# Altium PCB NewTrackerIRControl.PcbDoc (part 2 of 2)
Units mm, origin at the board's own origin, x right, y up, seen from the top; angles counter-clockwise.
Board outline 54 x 54 mm, 2 copper layers (Top Layer, Bottom Layer), stack 1.581 mm thick; 42 components, 15 nets, 94 pads, 126 vias.
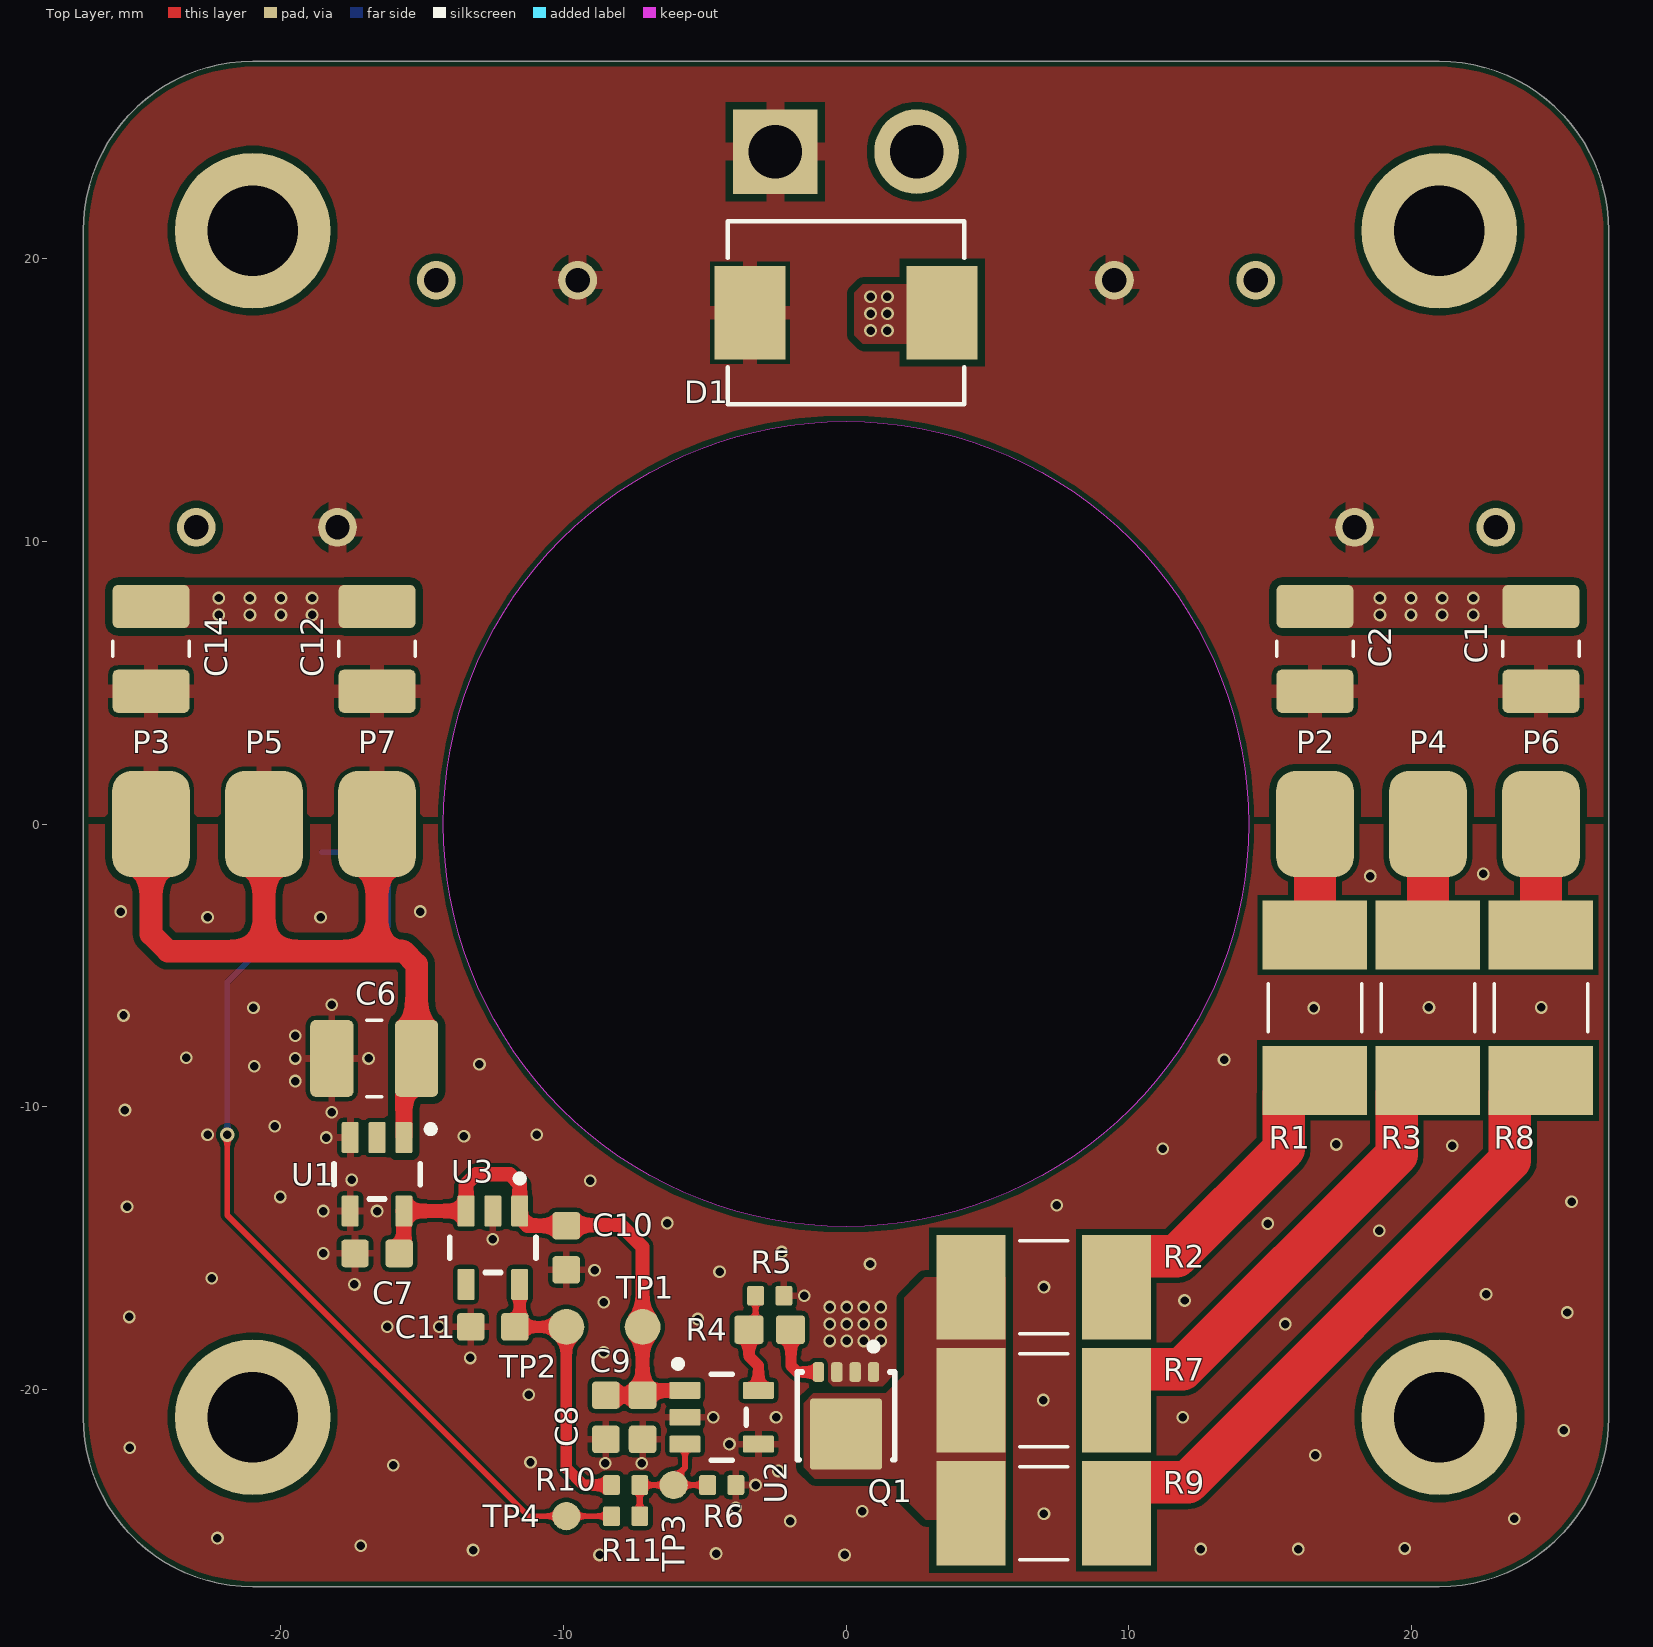
[diagram p0: Top Layer view]

## Part data (continued)
R4: library part CRCW060310R0FKEAHP, "10Ω Res Thick Film 0603 10 Ohm 1% 1/3W ±100ppm/°C Molded SMD SMD Paper T/R", Case Code (Imperial)=0603, Case Code (Metric)=1608, Manufacturer=Vishay, Max Operating Temperature=155°C, Max Power Dissipation=250mW, Min Operating Temperature=-55°C, Power Rating=330mW, Ratings=AEC-Q200, Supplier Part Number 1=541-10.0SCT-ND, Temperature Coefficient=100ppm/°C, Tolerance=±1%, Voltage Rating=75V, Case/Package=0603, Category="Chip SMD Resistors", China RoHS=Non-Compliant, ComponentLink1Description=https://datasheet.octopart.com:443/CRCW060310R0FKEAHP-Vishay-datasheet-13148866.pdf?src-supplier=Future+Electronics, ComponentLink1URL=https://datasheet.octopart.com:443/CRCW060310R0FKEAHP-Vishay-datasheet-13148866.pdf?src-supplier=Future+Electronics, ComponentLink2Description=https://datasheet.octopart.com:443/CRCW060310R0FKEAHP-Vishay-datasheet-13131392.pdf?src-supplier=Future+Electronics, ComponentLink2URL=https://datasheet.octopart.com:443/CRCW060310R0FKEAHP-Vishay-datasheet-13131392.pdf?src-supplier=Future+Electronics, ComponentLink3Description=https://datasheet.octopart.com:443/CRCW060310R0FKEAHP-Vishay-datasheet-12593106.pdf?src-supplier=Future+Electronics, ComponentLink3URL=https://datasheet.octopart.com:443/CRCW060310R0FKEAHP-Vishay-datasheet-12593106.pdf?src-supplier=Future+Electronics, ComponentLink4Description=https://datasheet.octopart.com:443/CRCW060310R0FKEAHP-Vishay-datasheet-12544674.pdf?src-supplier=Future+Electronics, ComponentLink4URL=https://datasheet.octopart.com:443/CRCW060310R0FKEAHP-Vishay-datasheet-12544674.pdf?src-supplier=Future+Electronics, ComponentLink5Description=https://datasheet.octopart.com:443/CRCW060310R0FKEAHP-Vishay-datasheet-12531795.pdf?src-supplier=Future+Electronics, ComponentLink5URL=https://datasheet.octopart.com:443/CRCW060310R0FKEAHP-Vishay-datasheet-12531795.pdf?src-supplier=Future+Electronics, ComponentLink6Description=https://datasheet.octopart.com:443/CRCW060310R0FKEAHP-Vishay-datasheet-12509906.pdf?src-supplier=Future+Electronics, ComponentLink6URL=https://datasheet.octopart.com:443/CRCW060310R0FKEAHP-Vishay-datasheet-12509906.pdf?src-supplier=Future+Electronics, ComponentLink7Description=https://datasheet.octopart.com:443/CRCW060310R0FKEAHP-Vishay-datasheet-10669844.pdf?src-supplier=Future+Electronics, ComponentLink7URL=https://datasheet.octopart.com:443/CRCW060310R0FKEAHP-Vishay-datasheet-10669844.pdf?src-supplier=Future+Electronics, ComponentLink8Description=https://datasheet.octopart.com:443/CRCW060310R0FKEAHP-Vishay-datasheet-8703221.pdf?src-supplier=Future+Electronics, ComponentLink8URL=https://datasheet.octopart.com:443/CRCW060310R0FKEAHP-Vishay-datasheet-8703221.pdf?src-supplier=Future+Electronics, ComponentLink9Description=https://datasheet.octopart.com:443/CRCW060310R0FKEAHP-Vishay-datasheet-62316122.pdf?src-supplier=Future+Electronics, ComponentLink9URL=https://datasheet.octopart.com:443/CRCW060310R0FKEAHP-Vishay-datasheet-62316122.pdf?src-supplier=Future+Electronics, ComponentLink10Description=https://datasheet.octopart.com:443/CRCW060310R0FKEAHP-Vishay-datasheet-12518686.pdf?src-supplier=_legacy+Avnet, ComponentLink10URL=https://datasheet.octopart.com:443/CRCW060310R0FKEAHP-Vishay-datasheet-12518686.pdf?src-supplier=_legacy+Avnet, ComponentLink11Description=https://datasheet.octopart.com:443/CRCW060310R0FKEAHP-Vishay-datasheet-87136057.pdf?src-supplier=element14+APAC, ComponentLink11URL=https://datasheet.octopart.com:443/CRCW060310R0FKEAHP-Vishay-datasheet-87136057.pdf?src-supplier=element14+APAC, ComponentLink12Description=https://datasheet.octopart.com:443/CRCW060310R0FKEAHP-Vishay-datasheet-78776210.pdf?src-supplier=element14+APAC, ComponentLink12URL=https://datasheet.octopart.com:443/CRCW060310R0FKEAHP-Vishay-datasheet-78776210.pdf?src-supplier=element14+APAC, ComponentLink13Description=https://datasheet.octopart.com:443/CRCW060310R0FKEAHP-Vishay-datasheet-62317933.pdf?src-supplier=element14+APAC, ComponentLink13URL=https://datasheet.octopart.com:443/CRCW060310R0FKEAHP-Vishay-datasheet-62317933.pdf?src-supplier=element14+APAC, ComponentLink14Description=https://datasheet.octopart.com:443/CRCW060310R0FKEAHP-Vishay-datasheet-66581887.pdf?src-supplier=element14+APAC, ComponentLink14URL=https://datasheet.octopart.com:443/CRCW060310R0FKEAHP-Vishay-datasheet-66581887.pdf?src-supplier=element14+APAC, ComponentLink15Description=https://datasheet.octopart.com:443/CRCW060310R0FKEAHP-Vishay-datasheet-37143532.pdf?src-supplier=Newark, ComponentLink15URL=https://datasheet.octopart.com:443/CRCW060310R0FKEAHP-Vishay-datasheet-37143532.pdf?src-supplier=Newark, ComponentLink16Description=https://datasheet.octopart.com:443/CRCW060310R0FKEAHP-Vishay-datasheet-8359436.pdf?src-supplier=Newark, ComponentLink16URL=https://datasheet.octopart.com:443/CRCW060310R0FKEAHP-Vishay-datasheet-8359436.pdf?src-supplier=Newark, ComponentLink17Description=https://datasheet.octopart.com:443/CRCW060310R0FKEAHP-Vishay-datasheet-112276998.pdf?src-supplier=Newark, ComponentLink17URL=https://datasheet.octopart.com:443/CRCW060310R0FKEAHP-Vishay-datasheet-112276998.pdf?src-supplier=Newark, ComponentLink18Description=https://datasheet.octopart.com:443/CRCW060310R0FKEAHP-Vishay-datasheet-192322425.pdf?src-supplier=HQonline, ComponentLink18URL=https://datasheet.octopart.com:443/CRCW060310R0FKEAHP-Vishay-datasheet-192322425.pdf?src-supplier=HQonline, ComponentLink19Description=https://datasheet.octopart.com/CRCW060310R0FKEAHP-Vishay-datasheet-83567917.pdf, ComponentLink19URL=https://datasheet.octopart.com/CRCW060310R0FKEAHP-Vishay-datasheet-83567917.pdf, ComponentLink20Description=https://datasheet.octopart.com/D-CRCW-e3-Standard-Thick-Film-Chip-Resistors-Vishay-datasheet-family-64.pdf, ComponentLink20URL=https://datasheet.octopart.com/D-CRCW-e3-Standard-Thick-Film-Chip-Resistors-Vishay-datasheet-family-64.pdf, ComponentLink21Description=https://datasheet.octopart.com:443/CRCW060310R0FKEAHP-Vishay-Dale-datasheet-47688881.pdf?src-supplier=RS+(Formerly+Allied+Electronics), ComponentLink21URL=https://datasheet.octopart.com:443/CRCW060310R0FKEAHP-Vishay-Dale-datasheet-47688881.pdf?src-supplier=RS+(Formerly+Allied+Electronics), ComponentLink22Description=https://datasheet.octopart.com:443/CRCW060310R0FKEAHP-Vishay-datasheet-17834126.pdf?src-supplier=TME, ComponentLink22URL=https://datasheet.octopart.com:443/CRCW060310R0FKEAHP-Vishay-datasheet-17834126.pdf?src-supplier=TME, ComponentLink23Description=http://sigma.octopart.com:80/rohs_certificate/D-CRCW-e3-Standard-Thick-Film-Chip-Resistors-Vishay-family-102.pdf?src-supplier=Compliance+Statements, ComponentLink23URL=http://sigma.octopart.com:80/rohs_certificate/D-CRCW-e3-Standard-Thick-Film-Chip-Resistors-Vishay-family-102.pdf?src-supplier=Compliance+Statements, Composition="Thick Film", Contact Plating=Tin, Depth=850µm, Features="Automotive AEC-Q200", Height=450µm, Lead Free="Lead Free", Length=1.6mm, Lifecycle Status=Production, Manufacturer Part Number=CRCW060310R0FKEAHP, Military Standard=Not, Mount="Surface Mount", Number of Pins=2, Number of Terminals=2, Number of Terminations=2, Packaging="Cut Tape", Pricing 1="1=0.15, 10=0.072, 25=0.0564, 50=0.0472, 100=0.04, 250=0.03284, 500=0.02872, 1000=0.02546 (USD)", Radiation Hardening=No, REACH SVHC=Yes, Resistance=10Ω, RoHS=Compliant, Schedule B="8533210045, 8533210045|8533210045|8533210045|8533210045|8533210045", Stock 1=818624, Supplier 1=DigiKey, Termination=Solder, Voltage Rating (DC)=75V, Weight=2.012816mg, Width=850µm, Working Voltage=75V
R5: library part CRCW040210K0FKEDHP, "10kΩ Res Thick Film 0402 10K Ohm 1% 0.2W ±100ppm/°C Molded SMD SMD Paper T/R", Case Code (Imperial)=0402, Case Code (Metric)=1005, Manufacturer=Vishay, Manufacturer Package Identifier=CRCW0402-HPe3, Max Operating Temperature=155°C, Min Operating Temperature=-55°C, Power Rating=200mW, Ratings=AEC-Q200, Resistance=10kΩ, Supplier Part Number 1=541-10.0KYDKR-ND, Temperature Coefficient=100ppm/°C, Tolerance=±1%, Voltage Rating=50V, Case/Package=0402, Category="Chip SMD Resistors", China RoHS=Non-Compliant, ComponentLink1Description=https://datasheet.octopart.com/CRCW040210K0FKEDHP-Vishay-datasheet-83567917.pdf, ComponentLink1URL=https://datasheet.octopart.com/CRCW040210K0FKEDHP-Vishay-datasheet-83567917.pdf, ComponentLink2Description=https://datasheet.octopart.com:443/CRCW040210K0FKEDHP-Vishay-datasheet-13148866.pdf?src-supplier=Newark, ComponentLink2URL=https://datasheet.octopart.com:443/CRCW040210K0FKEDHP-Vishay-datasheet-13148866.pdf?src-supplier=Newark, ComponentLink3Description=https://datasheet.octopart.com:443/CRCW040210K0FKEDHP-Vishay-datasheet-13131392.pdf?src-supplier=Newark, ComponentLink3URL=https://datasheet.octopart.com:443/CRCW040210K0FKEDHP-Vishay-datasheet-13131392.pdf?src-supplier=Newark, ComponentLink4Description=https://datasheet.octopart.com:443/CRCW040210K0FKEDHP-Vishay-datasheet-12593106.pdf?src-supplier=Newark, ComponentLink4URL=https://datasheet.octopart.com:443/CRCW040210K0FKEDHP-Vishay-datasheet-12593106.pdf?src-supplier=Newark, ComponentLink5Description=https://datasheet.octopart.com:443/CRCW040210K0FKEDHP-Vishay-datasheet-12544674.pdf?src-supplier=Newark, ComponentLink5URL=https://datasheet.octopart.com:443/CRCW040210K0FKEDHP-Vishay-datasheet-12544674.pdf?src-supplier=Newark, ComponentLink6Description=https://datasheet.octopart.com:443/CRCW040210K0FKEDHP-Vishay-datasheet-12531795.pdf?src-supplier=Newark, ComponentLink6URL=https://datasheet.octopart.com:443/CRCW040210K0FKEDHP-Vishay-datasheet-12531795.pdf?src-supplier=Newark, ComponentLink7Description=https://datasheet.octopart.com:443/CRCW040210K0FKEDHP-Vishay-datasheet-12518686.pdf?src-supplier=Newark, ComponentLink7URL=https://datasheet.octopart.com:443/CRCW040210K0FKEDHP-Vishay-datasheet-12518686.pdf?src-supplier=Newark, ComponentLink8Description=https://datasheet.octopart.com:443/CRCW040210K0FKEDHP-Vishay-datasheet-12509906.pdf?src-supplier=Newark, ComponentLink8URL=https://datasheet.octopart.com:443/CRCW040210K0FKEDHP-Vishay-datasheet-12509906.pdf?src-supplier=Newark, ComponentLink9Description=https://datasheet.octopart.com:443/CRCW040210K0FKEDHP-Vishay-datasheet-10669844.pdf?src-supplier=Newark, ComponentLink9URL=https://datasheet.octopart.com:443/CRCW040210K0FKEDHP-Vishay-datasheet-10669844.pdf?src-supplier=Newark, ComponentLink10Description=https://datasheet.octopart.com:443/CRCW040210K0FKEDHP-Vishay-datasheet-8703221.pdf?src-supplier=Newark, ComponentLink10URL=https://datasheet.octopart.com:443/CRCW040210K0FKEDHP-Vishay-datasheet-8703221.pdf?src-supplier=Newark, ComponentLink11Description=https://datasheet.octopart.com:443/CRCW040210K0FKEDHP.-Vishay-datasheet-78776210.pdf?src-supplier=Newark, ComponentLink11URL=https://datasheet.octopart.com:443/CRCW040210K0FKEDHP.-Vishay-datasheet-78776210.pdf?src-supplier=Newark, ComponentLink12Description=https://datasheet.octopart.com:443/CRCW040210K0FKEDHP-Vishay-datasheet-21268118.pdf?src-supplier=Newark, ComponentLink12URL=https://datasheet.octopart.com:443/CRCW040210K0FKEDHP-Vishay-datasheet-21268118.pdf?src-supplier=Newark, ComponentLink13Description=https://datasheet.octopart.com:443/CRCW040210K0FKEDHP-Vishay-datasheet-21226360.pdf?src-supplier=Newark, ComponentLink13URL=https://datasheet.octopart.com:443/CRCW040210K0FKEDHP-Vishay-datasheet-21226360.pdf?src-supplier=Newark, ComponentLink14Description=https://datasheet.octopart.com:443/CRCW040210K0FKEDHP-Vishay-Draloric-datasheet-8359436.pdf?src-supplier=Newark, ComponentLink14URL=https://datasheet.octopart.com:443/CRCW040210K0FKEDHP-Vishay-Draloric-datasheet-8359436.pdf?src-supplier=Newark, ComponentLink15Description=https://datasheet.octopart.com:443/CRCW040210K0FKEDHP-Vishay-datasheet-87136057.pdf?src-supplier=Farnell, ComponentLink15URL=https://datasheet.octopart.com:443/CRCW040210K0FKEDHP-Vishay-datasheet-87136057.pdf?src-supplier=Farnell, ComponentLink16Description=https://datasheet.octopart.com:443/CRCW040210K0FKEDHP-Vishay-datasheet-37143532.pdf?src-supplier=Farnell, ComponentLink16URL=https://datasheet.octopart.com:443/CRCW040210K0FKEDHP-Vishay-datasheet-37143532.pdf?src-supplier=Farnell, ComponentLink17Description=https://datasheet.octopart.com:443/CRCW040210K0FKEDHP-Vishay-datasheet-41195455.pdf?src-supplier=Farnell, ComponentLink17URL=https://datasheet.octopart.com:443/CRCW040210K0FKEDHP-Vishay-datasheet-41195455.pdf?src-supplier=Farnell, ComponentLink18Description=https://datasheet.octopart.com:443/CRCW040210K0FKEDHP.-Vishay-datasheet-66581887.pdf?src-supplier=Farnell, ComponentLink18URL=https://datasheet.octopart.com:443/CRCW040210K0FKEDHP.-Vishay-datasheet-66581887.pdf?src-supplier=Farnell, ComponentLink19Description=https://datasheet.octopart.com:443/CRCW040210K0FKEDHP-Vishay-datasheet-62317933.pdf?src-supplier=element14+APAC, ComponentLink19URL=https://datasheet.octopart.com:443/CRCW040210K0FKEDHP-Vishay-datasheet-62317933.pdf?src-supplier=element14+APAC, ComponentLink20Description=https://datasheet.octopart.com:443/CRCW040210K0FKEDHP-Vishay-Dale-datasheet-41169523.pdf?src-supplier=element14+APAC, ComponentLink20URL=https://datasheet.octopart.com:443/CRCW040210K0FKEDHP-Vishay-Dale-datasheet-41169523.pdf?src-supplier=element14+APAC, ComponentLink21Description=https://datasheet.octopart.com:443/CRCW040210K0FKEDHP-Vishay-datasheet-192322387.pdf?src-supplier=HQonline, ComponentLink21URL=https://datasheet.octopart.com:443/CRCW040210K0FKEDHP-Vishay-datasheet-192322387.pdf?src-supplier=HQonline, ComponentLink22Description=https://datasheet.octopart.com:443/CRCW040210K0FKEDHP-Vishay-datasheet-62316122.pdf?src-supplier=Future+Electronics, ComponentLink22URL=https://datasheet.octopart.com:443/CRCW040210K0FKEDHP-Vishay-datasheet-62316122.pdf?src-supplier=Future+Electronics, ComponentLink23Description=https://datasheet.octopart.com:443/CRCW040210K0FKEDHP-Vishay-Dale-datasheet-47688881.pdf?src-supplier=RS+(Formerly+Allied+Electronics), ComponentLink23URL=https://datasheet.octopart.com:443/CRCW040210K0FKEDHP-Vishay-Dale-datasheet-47688881.pdf?src-supplier=RS+(Formerly+Allied+Electronics), ComponentLink24Description=https://datasheet.octopart.com:443/CRCW040210K0FKEDHP-Vishay-datasheet-11548710.pdf?src-supplier=Arrow+Electronics, ComponentLink24URL=https://datasheet.octopart.com:443/CRCW040210K0FKEDHP-Vishay-datasheet-11548710.pdf?src-supplier=Arrow+Electronics, ComponentLink25Description=http://sigma.octopart.com:80/rohs_statement/Vishay-company-15.pdf?src-supplier=Compliance+Statements, ComponentLink25URL=http://sigma.octopart.com:80/rohs_statement/Vishay-company-15.pdf?src-supplier=Compliance+Statements, Composition="Thick Film", Contact Plating=Tin, Country of Origin="Israel, Mainland China", Depth=500µm, Export Control Classification Number (ECCN) Code=EAR99, Harmonized Tariff Schedule (HTS) Code=8533.21.00.30, Height=300µm, Introduction Date=2008-07-29, Lead Free="Lead Free", Length=1mm, Lifecycle Status=Production, Manufacturer Part Number=CRCW040210K0FKEDHP, Military Standard=Not, Mount="Surface Mount", Number of Pins=2, Number of Terminals=2, Packaging="Cut Tape", Pricing 1="1=0.12, 10=0.057, 25=0.0436, 50=0.0362, 100=0.0303, 250=0.02452, 500=0.02122, 1000=0.0186, 5000=0.01445 (USD)", Radiation Hardening=No, REACH SVHC=Yes, RoHS=Compliant, Schedule B=8533210045, Stock 1=168325, Supplier 1=DigiKey, Termination=SMD/SMT, Voltage Rating (DC)=50V, Weight=652.039032µg, Width=500µm, Working Voltage=50V
R6: library part RT0402BRD07100KL, "100kΩ 62.5mW Thin Film Resistor ±25ppm/℃ ±0.1% 100kΩ 0402 Chip Resistor - Surface Mount ROHS", Case Code (Imperial)=0402, Manufacturer="Yageo Group", Max Operating Temperature=155°C, Max Power Dissipation=63mW, Min Operating Temperature=-55°C, Power Rating=62.5mW, Resistance=100kΩ, Supplier Part Number 1=YAG1343CT-ND, Temperature Coefficient=25ppm/°C, Tolerance=±0.1%, Voltage Rating=50V, Case/Package=0402, Category="Chip SMD Resistors", China RoHS=Non-Compliant, ComponentLink1Description=https://datasheet.octopart.com:443/RT0402BRD07100KL-Yageo-datasheet-176402239.pdf?src-supplier=Future+Electronics, ComponentLink1URL=https://datasheet.octopart.com:443/RT0402BRD07100KL-Yageo-datasheet-176402239.pdf?src-supplier=Future+Electronics, ComponentLink2Description=https://datasheet.octopart.com:443/RT0402BRD07100KL-Yageo-datasheet-169971040.pdf?src-supplier=Future+Electronics, ComponentLink2URL=https://datasheet.octopart.com:443/RT0402BRD07100KL-Yageo-datasheet-169971040.pdf?src-supplier=Future+Electronics, ComponentLink3Description=https://datasheet.octopart.com:443/RT0402BRD07100KL-Yageo-datasheet-166250672.pdf?src-supplier=Future+Electronics, ComponentLink3URL=https://datasheet.octopart.com:443/RT0402BRD07100KL-Yageo-datasheet-166250672.pdf?src-supplier=Future+Electronics, ComponentLink4Description=https://datasheet.octopart.com:443/RT0402BRD07100KL-Yageo-datasheet-136673517.pdf?src-supplier=Future+Electronics, ComponentLink4URL=https://datasheet.octopart.com:443/RT0402BRD07100KL-Yageo-datasheet-136673517.pdf?src-supplier=Future+Electronics, ComponentLink5Description=https://datasheet.octopart.com:443/RT0402BRD07100KL-Yageo-datasheet-137700930.pdf?src-supplier=Future+Electronics, ComponentLink5URL=https://datasheet.octopart.com:443/RT0402BRD07100KL-Yageo-datasheet-137700930.pdf?src-supplier=Future+Electronics, ComponentLink6Description=https://datasheet.octopart.com:443/RT0402BRD07100KL-Yageo-datasheet-41589729.pdf?src-supplier=Future+Electronics, ComponentLink6URL=https://datasheet.octopart.com:443/RT0402BRD07100KL-Yageo-datasheet-41589729.pdf?src-supplier=Future+Electronics, ComponentLink7Description=https://datasheet.octopart.com:443/RT0402BRD07100KL-Yageo-datasheet-12594463.pdf?src-supplier=Future+Electronics, ComponentLink7URL=https://datasheet.octopart.com:443/RT0402BRD07100KL-Yageo-datasheet-12594463.pdf?src-supplier=Future+Electronics, ComponentLink8Description=https://datasheet.octopart.com:443/RT0402BRD07100KL-Yageo-datasheet-10915759.pdf?src-supplier=Future+Electronics, ComponentLink8URL=https://datasheet.octopart.com:443/RT0402BRD07100KL-Yageo-datasheet-10915759.pdf?src-supplier=Future+Electronics, ComponentLink9Description=https://datasheet.octopart.com:443/RT0402BRD07100KL-Yageo-datasheet-34924148.pdf?src-supplier=Future+Electronics, ComponentLink9URL=https://datasheet.octopart.com:443/RT0402BRD07100KL-Yageo-datasheet-34924148.pdf?src-supplier=Future+Electronics, ComponentLink10Description=https://datasheet.octopart.com:443/RT0402BRD07100KL-Yageo-datasheet-96443642.pdf?src-supplier=Upverter, ComponentLink10URL=https://datasheet.octopart.com:443/RT0402BRD07100KL-Yageo-datasheet-96443642.pdf?src-supplier=Upverter, ComponentLink11Description=https://datasheet.octopart.com:443/RT0402BRD07100KL-Yageo-Group-datasheet-188167888.pdf?src-supplier=LCSC, ComponentLink11URL=https://datasheet.octopart.com:443/RT0402BRD07100KL-Yageo-Group-datasheet-188167888.pdf?src-supplier=LCSC, ComponentLink12Description=https://datasheet.octopart.com:443/RT0402BRD07100KL-Yageo-datasheet-164439670.pdf?src-supplier=Newark, ComponentLink12URL=https://datasheet.octopart.com:443/RT0402BRD07100KL-Yageo-datasheet-164439670.pdf?src-supplier=Newark, ComponentLink13Description=https://datasheet.octopart.com:443/RT0402BRD07100KL-Yageo-Group-datasheet-141265893.pdf?src-supplier=ODG+(Origin+Data+Global), ComponentLink13URL=https://datasheet.octopart.com:443/RT0402BRD07100KL-Yageo-Group-datasheet-141265893.pdf?src-supplier=ODG+(Origin+Data+Global), ComponentLink14Description=https://datasheet.octopart.com/RT0402BRD07100KL-Yageo-datasheet-86813807.pdf, ComponentLink14URL=https://datasheet.octopart.com/RT0402BRD07100KL-Yageo-datasheet-86813807.pdf, ComponentLink15Description=http://sigma.octopart.com:80/conflict_mineral_statement/Yageo-company-3.pdf?src-supplier=Compliance+Statements, ComponentLink15URL=http://sigma.octopart.com:80/conflict_mineral_statement/Yageo-company-3.pdf?src-supplier=Compliance+Statements, ComponentLink16Description=http://sigma.octopart.com:80/rohs_statement/Yageo-company-2.pdf?src-supplier=Compliance+Statements, ComponentLink16URL=http://sigma.octopart.com:80/rohs_statement/Yageo-company-2.pdf?src-supplier=Compliance+Statements, Composition="Thin Film", Country of Origin="Mainland China", Depth=500µm, Export Control Classification Number (ECCN) Code=EAR99, Features="Moisture Resistant", Harmonized Tariff Schedule (HTS) Code=8533.21.00.30, Height=300µm, Introduction Date=2008-06-09, Lead Free="Lead Free", Length=1mm, Lifecycle Status=Production, Manufacturer Part Number=RT0402BRD07100KL, Military Standard=Not, Mount="Surface Mount", Number of Terminals=2, Number of Terminations=2, Pricing 1="1=0.1, 10=0.078, 25=0.0724, 50=0.0684, 100=0.0646, 250=0.05992, 500=0.05672, 1000=0.05377, 5000=0.04796 (USD)", REACH SVHC=Yes, RoHS=Compliant, Schedule B="8533210045, 8533210045|8533210045|8533210045|8533210045|8533210045", Stock 1=176013, Supplier 1=DigiKey, Termination=SMD/SMT, Voltage Rating (DC)=50V, Width=500µm, Working Voltage=50V
R10 R11: library part RCS04020000Z0ED, "0Ω Resistor, Jumper, 0402 [1005 Metric], Thick Film, 200 mW, 3 A, Surface Mount Device", Case Code (Imperial)=0402, Case Code (Metric)=1005, Manufacturer=Vishay, Max Current Rating=3A, Max Operating Temperature=155°C, Max Power Dissipation=200mW, Min Operating Temperature=-55°C, Ratings=AEC-Q200, Resistance=0Ω, Supplier Part Number 1=541-2877-6-ND, Tolerance=±5%, Voltage Rating=50V, Case/Package=0402, Category="Chip SMD Resistors", China RoHS=Non-Compliant, ComponentLink1Description=https://datasheet.octopart.com:443/RCS04020000Z0ED-Vishay-datasheet-176436275.pdf?src-supplier=IHS, ComponentLink1URL=https://datasheet.octopart.com:443/RCS04020000Z0ED-Vishay-datasheet-176436275.pdf?src-supplier=IHS, ComponentLink2Description=https://datasheet.octopart.com:443/RCS04020000Z0ED-Vishay-datasheet-86813749.pdf?src-supplier=Future+Electronics, ComponentLink2URL=https://datasheet.octopart.com:443/RCS04020000Z0ED-Vishay-datasheet-86813749.pdf?src-supplier=Future+Electronics, ComponentLink3Description=http://sigma.octopart.com:80/rohs_statement/Vishay-company-15.pdf?src-supplier=Compliance+Statements, ComponentLink3URL=http://sigma.octopart.com:80/rohs_statement/Vishay-company-15.pdf?src-supplier=Compliance+Statements, Composition="Thick Film", Country of Origin="Israel, Mainland China", Export Control Classification Number (ECCN) Code=EAR99, Features="Automotive AEC-Q200", Harmonized Tariff Schedule (HTS) Code=8533.21.00.30, Height=350µm, Introduction Date=2016-07-12, Length=1mm, Lifecycle Status=Production, Manufacturer Part Number=RCS04020000Z0ED, Mount="Surface Mount", Number of Terminals=2, Number of Terminations=2, Power Rating=200mW, Pricing 1="1=0.1, 10=0.032, 25=0.0268, 50=0.0232, 100=0.0204, 250=0.01728, 500=0.01532, 1000=0.01364, 5000=0.01064 (USD)", REACH SVHC=Yes, RoHS=Compliant, Stock 1=775160, Supplier 1=DigiKey, Voltage Rating (DC)=50V, Width=500µm
U1: "Automotive 150-mA, off-battery (40-V), high-PSRR, low-IQ, low-dropout voltage regulator", Case/Package=SOT-23, Dropout Voltage=450mV, Manufacturer="Texas Instruments", Manufacturer Lifecycle Status=ACTIVE, Max Input Voltage=40V, Max Junction Temperature (Tj)=150°C, Max Operating Temperature=125°C, Max Output Current=150mA, Min Input Voltage=5.5V, Min Operating Temperature=-40°C, Nominal Supply Current=15µA, Output Voltage=5V, Supplier Part Number 1=296-42411-1-ND, Accuracy=3%, Category="LDO Voltage Regulators", ComponentLink1Description=https://sigma.octopart.com:443/177332311/technical_drawing/Texas-Instruments-TPS7B6950QDBVRQ1.pdf?src-supplier=Texas+Instruments, ComponentLink1URL=https://sigma.octopart.com:443/177332311/technical_drawing/Texas-Instruments-TPS7B6950QDBVRQ1.pdf?src-supplier=Texas+Instruments, ComponentLink2Description=https://octopart.com:443/opatz8j6/c1?t=yage2jQM-eTAqOBcVFGrEpuvjezUa6ihi7wNyjCuRQGtqUC6dJhCNcRNS_lbs06BocBomxr_74svrzpLGaIERn-qG342R1-BuMQCMBX6cWI06iOToy_eqFmZlCkAcbh1TwQKhIc7V99vdu45YZgRDnkCuEoUv-OSe8c6IG6sPm0a8LlvliNVrX0XJQ9rtL59yZRVpqPT28bvqIjN2DJpQsbikYiQOe84sKG-y_S5m-YDL4KUutxFj13EdM63eCzAJFShkpsQB4Ak1CAByhedHpIePjBP_5H1ppNN2DNL-Xn5Oqs9d5pwb0NkBJzqlrDnQh0A3DSCzOpBQu1JykaSbQbIIYKMbQ8MSCb4hsuaqUoK8UzUCtio1IGXHXVj44cLB37iY0Kfm-Y&src-supplier=Texas+Instruments, ComponentLink2URL=https://octopart.com:443/opatz8j6/c1?t=yage2jQM-eTAqOBcVFGrEpuvjezUa6ihi7wNyjCuRQGtqUC6dJhCNcRNS_lbs06BocBomxr_74svrzpLGaIERn-qG342R1-BuMQCMBX6cWI06iOToy_eqFmZlCkAcbh1TwQKhIc7V99vdu45YZgRDnkCuEoUv-OSe8c6IG6sPm0a8LlvliNVrX0XJQ9rtL59yZRVpqPT28bvqIjN2DJpQsbikYiQOe84sKG-y_S5m-YDL4KUutxFj13EdM63eCzAJFShkpsQB4Ak1CAByhedHpIePjBP_5H1ppNN2DNL-Xn5Oqs9d5pwb0NkBJzqlrDnQh0A3DSCzOpBQu1JykaSbQbIIYKMbQ8MSCb4hsuaqUoK8UzUCtio1IGXHXVj44cLB37iY0Kfm-Y&src-supplier=Texas+Instruments, ComponentLink3Description=https://sigma.octopart.com:443/175570406/technical_drawing/Texas-Instruments-TPS7B6950QDBVRQ1.pdf?src-supplier=Texas+Instruments, ComponentLink3URL=https://sigma.octopart.com:443/175570406/technical_drawing/Texas-Instruments-TPS7B6950QDBVRQ1.pdf?src-supplier=Texas+Instruments, ComponentLink4Description=https://sigma.octopart.com:443/169406034/technical_drawing/Texas-Instruments-TPS7B6950QDBVRQ1.pdf?src-supplier=Texas+Instruments, ComponentLink4URL=https://sigma.octopart.com:443/169406034/technical_drawing/Texas-Instruments-TPS7B6950QDBVRQ1.pdf?src-supplier=Texas+Instruments, ComponentLink5Description=https://sigma.octopart.com:443/155939316/technical_drawing/Texas-Instruments-TPS7B6950QDBVRQ1.pdf?src-supplier=Texas+Instruments, ComponentLink5URL=https://sigma.octopart.com:443/155939316/technical_drawing/Texas-Instruments-TPS7B6950QDBVRQ1.pdf?src-supplier=Texas+Instruments, ComponentLink6Description=https://sigma.octopart.com:443/102331370/technical_drawing/Texas-Instruments-TPS7B6950QDBVRQ1.pdf?src-supplier=Texas+Instruments, ComponentLink6URL=https://sigma.octopart.com:443/102331370/technical_drawing/Texas-Instruments-TPS7B6950QDBVRQ1.pdf?src-supplier=Texas+Instruments, ComponentLink7Description=https://datasheet.octopart.com:443/TPS7B6950QDBVRQ1-Texas-Instruments-datasheet-41218873.pdf?src-supplier=Texas+Instruments, ComponentLink7URL=https://datasheet.octopart.com:443/TPS7B6950QDBVRQ1-Texas-Instruments-datasheet-41218873.pdf?src-supplier=Texas+Instruments, ComponentLink8Description=https://datasheet.octopart.com:443/TPS7B6950QDBVRQ1-Texas-Instruments-datasheet-36993199.pdf?src-supplier=Texas+Instruments, ComponentLink8URL=https://datasheet.octopart.com:443/TPS7B6950QDBVRQ1-Texas-Instruments-datasheet-36993199.pdf?src-supplier=Texas+Instruments, ComponentLink9Description=https://datasheet.octopart.com:443/TPS7B6950QDBVRQ1-Texas-Instruments-datasheet-34152532.pdf?src-supplier=Texas+Instruments, ComponentLink9URL=https://datasheet.octopart.com:443/TPS7B6950QDBVRQ1-Texas-Instruments-datasheet-34152532.pdf?src-supplier=Texas+Instruments, ComponentLink10Description=https://sigma.octopart.com:443/49249325/technical_drawing/Texas-Instruments-TPS7B6950QDBVRQ1.pdf?src-supplier=Texas+Instruments, ComponentLink10URL=https://sigma.octopart.com:443/49249325/technical_drawing/Texas-Instruments-TPS7B6950QDBVRQ1.pdf?src-supplier=Texas+Instruments, ComponentLink11Description=https://datasheet.octopart.com:443/TPS7B6950QDBVRQ1-Texas-Instruments-datasheet-159118311.pdf?src-supplier=Augswan, ComponentLink11URL=https://datasheet.octopart.com:443/TPS7B6950QDBVRQ1-Texas-Instruments-datasheet-159118311.pdf?src-supplier=Augswan, ComponentLink12Description=https://datasheet.octopart.com:443/TPS7B6950QDBVRQ1-Texas-Instruments-datasheet-137316104.pdf?src-supplier=Future+Electronics, ComponentLink12URL=https://datasheet.octopart.com:443/TPS7B6950QDBVRQ1-Texas-Instruments-datasheet-137316104.pdf?src-supplier=Future+Electronics, ComponentLink13Description=http://sigma.octopart.com:80/reach_statement/Texas-Instruments-company-64.pdf?src-supplier=Compliance+Statements, ComponentLink13URL=http://sigma.octopart.com:80/reach_statement/Texas-Instruments-company-64.pdf?src-supplier=Compliance+Statements, ComponentLink14Description=http://sigma.octopart.com:80/conflict_mineral_statement/Texas-Instruments-company-63.pdf?src-supplier=Compliance+Statements, ComponentLink14URL=http://sigma.octopart.com:80/conflict_mineral_statement/Texas-Instruments-company-63.pdf?src-supplier=Compliance+Statements, Contact Plating=Tin, Height=1.45mm, Lead Free="Lead Free", Length=2.9mm, Lifecycle Status=Production, Manufacturer Part Number=TPS7B6950QDBVRQ1, Max Supply Voltage=40V, Min Current Limit=150mA, Min Supply Voltage=5.5V, Mount="Surface Mount", Number of Outputs=1, Number of Pins=5, Number of Regulators=1, Output Current=150mA, Output Type=Fixed, Packaging="Tape & Reel (TR)", Polarity=Positive, Pricing 1="1=1.27, 10=0.921, 25=0.8336, 100=0.7374, 250=0.69156, 500=0.6639, 1000=0.65178 (USD)", Quiescent Current=15µA, RoHS=Compliant, Schedule B=8542390000, Stock 1=19905, Supplier 1=DigiKey, Thickness=1.2mm, Width=1.6mm
U2: "Texas Instruments 5Pin gate driver module, 20VPower, SOT-23encapsulation", Case/Package=SOT-23, Manufacturer="Texas Instruments", Manufacturer Lifecycle Status=ACTIVE, Max Junction Temperature (Tj)=140°C, Max Output Current=4A, Max Supply Voltage=18V, Min Operating Temperature=-40°C, Min Supply Voltage=4.5V, Operating Supply Voltage=12V, Supplier Part Number 1=296-39527-1-ND, Category="Gate Drivers", Channel Type=Single, ComponentLink1Description=https://sigma.octopart.com:443/177332311/technical_drawing/Texas-Instruments-UCC27517DBVR.pdf?src-supplier=Texas+Instruments, ComponentLink1URL=https://sigma.octopart.com:443/177332311/technical_drawing/Texas-Instruments-UCC27517DBVR.pdf?src-supplier=Texas+Instruments, ComponentLink2Description=https://octopart.com:443/opatz8j6/c1?t=QF-6TnH1_avSJoQ_0S3fiRDidLb9MxGJ4Uz9AwPT0qi1QfR0Fnj5DjTGeeHpbvHs8BjCC_ojhg6WztCpwH9uWHQg9GIa-AzAuCeOFGEbQxNialX3oAXWeuuXjgP1lL4t_JdhfZn_4ivmWfDReC5xef3gN95ASQZer4rTjIvWCu_kxVvyMyJAvfluM_if8tmkY5wKphml2G70Lzp-BMCIWPtYAxyUhprsDNZmykILQtdDZ3Gz1TmTnEk05PTX6KHGZ3jU6-36hwJXdlPG2psy-aBgnEFH6LhDn11bnNEHRcjhEfTTpqi6Xg91J0_YjKJ_VCt2sw1zN9H9homKZKSJklCc6aR8pl7O5AAZ3QjzuuNvD0DZizcwwNxx-IEAlhk7J9HyILY&src-supplier=Texas+Instruments, ComponentLink2URL=https://octopart.com:443/opatz8j6/c1?t=QF-6TnH1_avSJoQ_0S3fiRDidLb9MxGJ4Uz9AwPT0qi1QfR0Fnj5DjTGeeHpbvHs8BjCC_ojhg6WztCpwH9uWHQg9GIa-AzAuCeOFGEbQxNialX3oAXWeuuXjgP1lL4t_JdhfZn_4ivmWfDReC5xef3gN95ASQZer4rTjIvWCu_kxVvyMyJAvfluM_if8tmkY5wKphml2G70Lzp-BMCIWPtYAxyUhprsDNZmykILQtdDZ3Gz1TmTnEk05PTX6KHGZ3jU6-36hwJXdlPG2psy-aBgnEFH6LhDn11bnNEHRcjhEfTTpqi6Xg91J0_YjKJ_VCt2sw1zN9H9homKZKSJklCc6aR8pl7O5AAZ3QjzuuNvD0DZizcwwNxx-IEAlhk7J9HyILY&src-supplier=Texas+Instruments, ComponentLink3Description=https://sigma.octopart.com:443/175570406/technical_drawing/Texas-Instruments-UCC27517DBVR.pdf?src-supplier=Texas+Instruments, ComponentLink3URL=https://sigma.octopart.com:443/175570406/technical_drawing/Texas-Instruments-UCC27517DBVR.pdf?src-supplier=Texas+Instruments, ComponentLink4Description=https://sigma.octopart.com:443/169406034/technical_drawing/Texas-Instruments-UCC27517DBVR.pdf?src-supplier=Texas+Instruments, ComponentLink4URL=https://sigma.octopart.com:443/169406034/technical_drawing/Texas-Instruments-UCC27517DBVR.pdf?src-supplier=Texas+Instruments, ComponentLink5Description=https://sigma.octopart.com:443/155939316/technical_drawing/Texas-Instruments-UCC27517DBVR.pdf?src-supplier=Texas+Instruments, ComponentLink5URL=https://sigma.octopart.com:443/155939316/technical_drawing/Texas-Instruments-UCC27517DBVR.pdf?src-supplier=Texas+Instruments, ComponentLink6Description=https://sigma.octopart.com:443/102331370/technical_drawing/Texas-Instruments-UCC27517DBVR.pdf?src-supplier=Texas+Instruments, ComponentLink6URL=https://sigma.octopart.com:443/102331370/technical_drawing/Texas-Instruments-UCC27517DBVR.pdf?src-supplier=Texas+Instruments, ComponentLink7Description=https://sigma.octopart.com:443/49249325/technical_drawing/Texas-Instruments-UCC27517DBVR.pdf?src-supplier=Texas+Instruments, ComponentLink7URL=https://sigma.octopart.com:443/49249325/technical_drawing/Texas-Instruments-UCC27517DBVR.pdf?src-supplier=Texas+Instruments, ComponentLink8Description=https://datasheet.octopart.com:443/UCC27517DBVR-Texas-Instruments-datasheet-34159947.pdf?src-supplier=Texas+Instruments, ComponentLink8URL=https://datasheet.octopart.com:443/UCC27517DBVR-Texas-Instruments-datasheet-34159947.pdf?src-supplier=Texas+Instruments, ComponentLink9Description=https://datasheet.octopart.com:443/UCC27517DBVR-Texas-Instruments-datasheet-15828057.pdf?src-supplier=Texas+Instruments, ComponentLink9URL=https://datasheet.octopart.com:443/UCC27517DBVR-Texas-Instruments-datasheet-15828057.pdf?src-supplier=Texas+Instruments, ComponentLink10Description=https://datasheet.octopart.com:443/UCC27517DBVR-Texas-Instruments-datasheet-10824616.pdf?src-supplier=Texas+Instruments, ComponentLink10URL=https://datasheet.octopart.com:443/UCC27517DBVR-Texas-Instruments-datasheet-10824616.pdf?src-supplier=Texas+Instruments, ComponentLink11Description=https://datasheet.octopart.com:443/UCC27517DBVR-Texas-Instruments-datasheet-11522356.pdf?src-supplier=Newark, ComponentLink11URL=https://datasheet.octopart.com:443/UCC27517DBVR-Texas-Instruments-datasheet-11522356.pdf?src-supplier=Newark, ComponentLink12Description=https://datasheet.octopart.com:443/UCC27517DBVR-Texas-Instruments-datasheet-10899470.pdf?src-supplier=Arrow+Electronics, ComponentLink12URL=https://datasheet.octopart.com:443/UCC27517DBVR-Texas-Instruments-datasheet-10899470.pdf?src-supplier=Arrow+Electronics, ComponentLink13Description=https://datasheet.octopart.com:443/UCC27517DBVR-Texas-Instruments-datasheet-164421427.pdf?src-supplier=SHENGYU+ELECTRONICS, ComponentLink13URL=https://datasheet.octopart.com:443/UCC27517DBVR-Texas-Instruments-datasheet-164421427.pdf?src-supplier=SHENGYU+ELECTRONICS, ComponentLink14Description=https://datasheet.octopart.com:443/UCC27517DBVR-Texas-Instruments-datasheet-159118422.pdf?src-supplier=LCSC, ComponentLink14URL=https://datasheet.octopart.com:443/UCC27517DBVR-Texas-Instruments-datasheet-159118422.pdf?src-supplier=LCSC, ComponentLink15Description=https://datasheet.octopart.com:443/UCC27517DBVR-Texas-Instruments-datasheet-140572070.pdf?src-supplier=Arrow.cn, ComponentLink15URL=https://datasheet.octopart.com:443/UCC27517DBVR-Texas-Instruments-datasheet-140572070.pdf?src-supplier=Arrow.cn, ComponentLink16Description=http://sigma.octopart.com:80/reach_statement/Texas-Instruments-company-64.pdf?src-supplier=Compliance+Statements, ComponentLink16URL=http://sigma.octopart.com:80/reach_statement/Texas-Instruments-company-64.pdf?src-supplier=Compliance+Statements, ComponentLink17Description=http://sigma.octopart.com:80/conflict_mineral_statement/Texas-Instruments-company-63.pdf?src-supplier=Compliance+Statements, ComponentLink17URL=http://sigma.octopart.com:80/conflict_mineral_statement/Texas-Instruments-company-63.pdf?src-supplier=Compliance+Statements, Fall Time=7ns, Height=1.45mm, Lead Free="Lead Free", Length=2.9mm, Lifecycle Status=Production, Manufacturer Part Number=UCC27517DBVR, Max Operating Temperature=140°C, Mount="Surface Mount", Number of Channels=1, Number of Drivers=1, Number of Outputs=1, Number of Pins=5, Output Current=4A, Pricing 1="1=0.98, 10=0.701, 25=0.632, 100=0.5563, 250=0.5202, 500=0.4984, 1000=0.48348 (USD)", Propagation Delay=13ns, Radiation Hardening=No, Rise Time=8ns, RoHS=Compliant, Schedule B="8542390000, 8542390000|8542390000|8542390000|8542390000|8542390000", Stock 1=2734, Supplier 1=DigiKey, Thickness=1.2mm, Turn-On Delay Time=30ns, Width=1.6mm
U3: "300mA ultra-low-noise low-IQ low-dropout (LDO) linear regulator with high PSRR 5-SOT-23 -40 to 125", Case/Package=SOT-23-5, Dropout Voltage=145mV, Manufacturer="Texas Instruments", Manufacturer Lifecycle Status=ACTIVE, Max Junction Temperature (Tj)=125°C, Max Supply Voltage=6V, Min Operating Temperature=-40°C, Min Supply Voltage=1.6V, Nominal Supply Current=6.5µA, Output Current=300mA, Output Voltage=3.3V, Supplier Part Number 1=296-TPS7A2033PDBVRDKR-ND, Accuracy=1.5%, Category="LDO Voltage Regulators", ComponentLink1Description=https://sigma.octopart.com:443/177332311/technical_drawing/Texas-Instruments-TPS7A2033PDBVR.pdf?src-supplier=Texas+Instruments, ComponentLink1URL=https://sigma.octopart.com:443/177332311/technical_drawing/Texas-Instruments-TPS7A2033PDBVR.pdf?src-supplier=Texas+Instruments, ComponentLink2Description=https://octopart.com:443/opatz8j6/c1?t=jI4MJxUHNHWPLUTUjPFE_I4nFT9ogQQS70wFg6iEODFO8LbYHvqBDKPBMlDtEwO4fNGI88ubVwCkCjf0m79oYyvw0lNgXSr_kQlB_nshs-lDL0gpQEt062WpfwVbrY7aMcaNfk_VYcVu1c5ZyMHT8tYLznoJcMs0V3cIKOpV8FkTUbmZxBhaArT7MSQXB5rB175PQ9HeqkODOBcAb5uxQ4pXmdIRVFW0nHjT5bbTxbLCkHYQ6wSbjOTmjpzrmMdRq376bhW5SzS0L0ZYTijf2l1mplZ7KrrI9CUmQvcyMNcVPe6befGlNnr1fDH3Q5Ss6aSm6FD-UpaqOnEuIpR4XaVo6xK0ksEziWk1rzqOuekfSo_fNioOtoDqTgyhaxobMR58zb0N&src-supplier=Texas+Instruments, ComponentLink2URL=https://octopart.com:443/opatz8j6/c1?t=jI4MJxUHNHWPLUTUjPFE_I4nFT9ogQQS70wFg6iEODFO8LbYHvqBDKPBMlDtEwO4fNGI88ubVwCkCjf0m79oYyvw0lNgXSr_kQlB_nshs-lDL0gpQEt062WpfwVbrY7aMcaNfk_VYcVu1c5ZyMHT8tYLznoJcMs0V3cIKOpV8FkTUbmZxBhaArT7MSQXB5rB175PQ9HeqkODOBcAb5uxQ4pXmdIRVFW0nHjT5bbTxbLCkHYQ6wSbjOTmjpzrmMdRq376bhW5SzS0L0ZYTijf2l1mplZ7KrrI9CUmQvcyMNcVPe6befGlNnr1fDH3Q5Ss6aSm6FD-UpaqOnEuIpR4XaVo6xK0ksEziWk1rzqOuekfSo_fNioOtoDqTgyhaxobMR58zb0N&src-supplier=Texas+Instruments, ComponentLink3Description=https://sigma.octopart.com:443/175570406/technical_drawing/Texas-Instruments-TPS7A2033PDBVR.pdf?src-supplier=Texas+Instruments, ComponentLink3URL=https://sigma.octopart.com:443/175570406/technical_drawing/Texas-Instruments-TPS7A2033PDBVR.pdf?src-supplier=Texas+Instruments, ComponentLink4Description=https://sigma.octopart.com:443/169406034/technical_drawing/Texas-Instruments-TPS7A2033PDBVR.pdf?src-supplier=Texas+Instruments, ComponentLink4URL=https://sigma.octopart.com:443/169406034/technical_drawing/Texas-Instruments-TPS7A2033PDBVR.pdf?src-supplier=Texas+Instruments, ComponentLink5Description=https://sigma.octopart.com:443/155939316/technical_drawing/Texas-Instruments-TPS7A2033PDBVR.pdf?src-supplier=Texas+Instruments, ComponentLink5URL=https://sigma.octopart.com:443/155939316/technical_drawing/Texas-Instruments-TPS7A2033PDBVR.pdf?src-supplier=Texas+Instruments, ComponentLink6Description=https://datasheet.octopart.com:443/TPS7A2033PDBVR-Texas-Instruments-datasheet-149070019.pdf?src-supplier=Upverter, ComponentLink6URL=https://datasheet.octopart.com:443/TPS7A2033PDBVR-Texas-Instruments-datasheet-149070019.pdf?src-supplier=Upverter, ComponentLink7Description=https://datasheet.octopart.com:443/TPS7A2033PDBVR-Texas-Instruments-datasheet-164420832.pdf?src-supplier=Augswan, ComponentLink7URL=https://datasheet.octopart.com:443/TPS7A2033PDBVR-Texas-Instruments-datasheet-164420832.pdf?src-supplier=Augswan, ComponentLink8Description=https://datasheet.octopart.com:443/TPS7A2033PDBVR-Texas-Instruments-datasheet-159781690.pdf?src-supplier=LCSC, ComponentLink8URL=https://datasheet.octopart.com:443/TPS7A2033PDBVR-Texas-Instruments-datasheet-159781690.pdf?src-supplier=LCSC, ComponentLink9Description=http://sigma.octopart.com:80/reach_statement/Texas-Instruments-company-64.pdf?src-supplier=Compliance+Statements, ComponentLink9URL=http://sigma.octopart.com:80/reach_statement/Texas-Instruments-company-64.pdf?src-supplier=Compliance+Statements, ComponentLink10Description=http://sigma.octopart.com:80/conflict_mineral_statement/Texas-Instruments-company-63.pdf?src-supplier=Compliance+Statements, ComponentLink10URL=http://sigma.octopart.com:80/conflict_mineral_statement/Texas-Instruments-company-63.pdf?src-supplier=Compliance+Statements, Height=1.45mm, Length=2.9mm, Lifecycle Status=Production, Manufacturer Part Number=TPS7A2033PDBVR, Max Operating Temperature=125°C, Number of Channels=1, Number of Outputs=1, Number of Pins=5, Pricing 1="1=0.33, 10=0.225, 25=0.1992, 100=0.1715, 250=0.15828, 500=0.15028, 1000=0.14369 (USD)", RoHS=Compliant, Stock 1=57995, Supplier 1=DigiKey, Thickness=1.2mm, Width=1.6mm

## Free pads (board coordinates)
  round 5.5 hole 3.2 mask+0.051: 1(-21,21) 2(21,21) 3(21,-21) 4(-21,-21)

## Via types
v1: diameter 0.45, hole 0.3, Top Layer to Bottom Layer, tented both sides, 125 vias
v2: diameter 0.5, hole 0.3, Top Layer to Bottom Layer, tented both sides, 1 vias

## Nets (pads, with @x,y where several pads share a name; then routed paths per layer and width w, separated by ;. In a path a pad name is that pad's centre, name@x,y a point inside that pad or via, vN(x,y) a via of type N, cw(c..) or ccw(c..) an arc to the next point about the centre after c; other vN are vias at no path point)
+3V3: C11.2 R10.1 TP2.1 U3.5 | length 10.7
  Top Layer w0.2: C11.2@-11.82,-17.8 -11.82,-17.62 -11.7,-17.5 -11.639,-17.5 C11.2@-11.55,-17.411
  Top Layer w0.4: C11.2 TP2.1 -9.9,-22.8 -9.3,-23.4 R10.1 ; C11.2@-11.68,-17.76 -11.55,-17.63 -11.55,-17.411 U3.5
+5V: C7.2 C8.2 C9.2 C10.2 TP1.1 U1.5 U2.1 U3.1 U3.3 | length 20.6
  Top Layer w0.2: C7.2@-15.8,-15.2 C7.2@-15.65,-15.05 ; U1.5@-15.65,-13.75 -15.7,-13.7 U1.5 ; U3.3@-13.5,-13.7 U3.3
  Top Layer w0.5: U1.5@-15.7,-13.7 -13.7,-13.7 U3.3@-13.5,-13.7 ; C7.2@-15.65,-15.05 U1.5@-15.65,-13.75 ; U3.3 -13.45,-12.75 -13.1,-12.4 -11.9,-12.4 -11.55,-12.75 U3.1@-11.55,-13.2 ; U3.1 -11.55,-13.95 -11.28,-14.22 C10.2 ; C10.2@-9.834,-14.2 -7.975,-14.2 -7.2,-14.975 -7.2,-17.306 -7.156,-17.35 -7.15,-17.35 -7.2,-17.4 TP1.1 C9.2 ; C8.2 C9.2 ; U2.1 -5.775,-20.05 -5.8,-20.025 -5.825,-20.05 -7.03,-20.05 C9.2
+VBAT: C1.2 C2.2 C3.1 C4.1 C5.1 C6.2 C12.2 C13.1 C14.2 D1.2 J1.1 P3.1 P5.1 P7.1 U1.1 | length 29.2
  Top Layer w0.6: U1.1@-15.65,-11.05 -15.65,-8.75 C6.2
  Top Layer w0.8: P3.1 -24.6,-3.9 -24,-4.5 -20.6,-4.5 ; P5.1 -20.6,-4.5 ; P7.1 -16.7,0 -16.6,-0.1 -16.6,-4.5 ; C6.2 -15.2,-4.969 -15.669,-4.5 -16.6,-4.5 ; -20.6,-4.5 -16.6,-4.5
CHAINA: P2.1 R1.1 | length 3.9
  Top Layer w1.5: R1.1 P2.1
CHAINB: P4.1 R3.1 | length 3.9
  Top Layer w1.5: R3.1 P4.1
CHAINC: P6.1 R8.1 | length 3.9
  Top Layer w1.5: R8.1 P6.1
DRAIN: Q1.5-6-7-8 R2.1 R7.1 R9.1
G_OUT: R4.1 R5.2 U2.5 | length 3.6
  Top Layer w0.2: R4.1 -3.2,-17.665 R5.2
  Top Layer w0.4: R4.1 -3.435,-18.84 -3.1,-19.175 U2.5
GATE: Q1.4 R4.2 | length 2.3
  Top Layer w0.4: R4.2 -1.95,-17.915 -1.95,-19.175 -1.725,-19.4 -1,-19.4 Q1.4
GATE_IN: R6.2 R10.2 R11.2 TP3.1 U2.3 | length 5.2
  Top Layer w0.2: R11.2 R10.2 TP3.1 ; U2.3 -5.7,-22.784 -6.1,-23.184 TP3.1 ; R6.2 -5.075,-23.4 -5.1,-23.375 -5.1,-23.4 TP3.1
GND: C1.1 C2.1 C3.2 C4.2 C5.2 C6.1 C7.1 C8.1 C9.1 C10.1 C11.1 C12.1 C13.2 C14.1 D1.1 J1.2 P1.2 Q1.1 Q1.2 Q1.3 R5.1 R6.1 U1.3 U1.4 U2.2 U2.4 U3.2
  other v1: -8.725,-25.875 -0.05,-25.875 -4.6,-25.825 -13.2,-25.7 12.558,-25.667 16.008,-25.667 19.783,-25.642 -17.175,-25.55 -22.25,-25.275 -1.975,-24.675 23.658,-24.592 7.008,-24.417 0.575,-24.325 -3.9,-24.2 -3.2,-23.4 -2.4,-22.9 -16.025,-22.7 -8.525,-22.625 -7.225,-22.625 -11.168,-22.598 16.608,-22.342 -25.35,-22.075 -4.125,-21.95 25.408,-21.467 -4.7,-21 -2.475,-21 11.925,-21 6.983,-20.392 -11.225,-20.2 -13.3,-18.9 -8.575,-18.7 -0.575,-18.3 0.025,-18.3 0.625,-18.3 1.225,-18.3 -14.4,-17.8 -16.242,-17.792 -0.575,-17.7 0.025,-17.7 0.625,-17.7 1.225,-17.7 15.55,-17.7 -5.25,-17.525 -25.375,-17.45 25.533,-17.292 -0.575,-17.1 0.025,-17.1 0.625,-17.1 1.225,-17.1 -8.575,-16.925 11.983,-16.867 -1.475,-16.7 22.658,-16.642 7.008,-16.392 -17.4,-16.3 -22.45,-16.075 -4.475,-15.85 -8.9,-15.8 0.85,-15.575 -18.5,-15.2 -2.275,-15.15 -12.5,-14.7 18.875,-14.4 14.933,-14.142 -6.325,-14.125 -18.5,-13.7 -16.6,-13.7 -25.45,-13.55 7.458,-13.492 25.683,-13.367 -20.025,-13.2 -9.05,-12.625 -17.5,-12.6 11.208,-11.492 21.458,-11.392 17.358,-11.342 -18.4,-11.1 -13.525,-11.05 -22.6,-11 -10.95,-11 -20.225,-10.7 -18.2,-10.2 -25.525,-10.125 -19.5,-9.1 -20.95,-8.575 -12.975,-8.5 13.383,-8.342 -19.5,-8.3 -16.9,-8.3 -23.35,-8.275 -19.5,-7.5 -25.575,-6.775 -20.975,-6.5 16.558,-6.517 20.633,-6.492 24.608,-6.492 -18.2,-6.4 -22.6,-3.3 -18.6,-3.3 -25.675,-3.1 -15.075,-3.1 18.558,-1.842 22.558,-1.767 -22.2,7.4 -21.1,7.4 -20,7.4 -18.9,7.4 18.9,7.4 20,7.4 21.1,7.4 22.2,7.4 -22.2,8 -21.1,8 -20,8 -18.9,8 18.9,8 20,8 21.1,8 22.2,8 0.868,17.468 1.468,17.468 0.868,18.068 1.468,18.068 0.868,18.668 1.468,18.668
GPIO: P1.3 R11.1 TP4.1 | length 37.6
  Top Layer w0.2: v2(-21.9,-11) -21.9,-13.85 -11.25,-24.5 TP4.1 -8.4,-24.5 -8.3,-24.6 R11.1
  Bottom Layer w0.2: v2(-21.9,-11) -21.9,-5.6 -20.5,-4.2 -16.775,-4.2 -16.2,-3.625 -16.2,-1.527 -16.727,-1 P1.3
RES_A: R1.2 R2.2 | length 11.1
  Top Layer w1.5: R2.2@9.3,-15.4 9.4,-15.3 11.7,-15.3 15.5,-11.5 15.5,-10.429 15.5,-9.55 15.975,-9.075 R1.2
RES_B: R3.2 R7.2 | length 16.8
  Top Layer w1.5: R7.2@9.3,-19.4 9.4,-19.3 11.9,-19.3 19.5,-11.7 19.5,-10.429 19.5,-9.55 19.975,-9.075 R3.2
RES_C: R8.2 R9.2 | length 23.4
  Top Layer w1.5: R9.2@9.275,-24.4 9.275,-23.775 9.75,-23.3 12.1,-23.3 23.5,-11.9 23.5,-9.55 23.975,-9.075 R8.2
pads on no net: P1.1 P1.4 P1.5 P1.6 U1.2 U3.4

## Polygon pours and split planes (outlines as drawn)
GND on Top Layer "TOPGND" (solid, pour order 40): 27,0 27,-27 -27,-27 -27,0
GND on Top Layer "PADEE" (solid, pour order 25): -0.625,-19.625 -0.625,-19.75 -0.475,-19.9 -0.35,-19.9 1.3,-19.9 1.5,-19.7 1.5,-16.7 -0.675,-16.7 -1.35,-17.375 -1.35,-19.375 -0.875,-19.375 -0.867,-19.383
+VBAT on Top Layer "14" (solid, pour order 42): -27,0 -27,28 27,28 27,0
GND on Top Layer "3" (solid, pour order 3): 23.475,6.95 23.475,8.45 17.5,8.45 17.5,6.95
GND on Top Layer "2" (solid, pour order 16): -19.325,6.95 -20.7,6.95 -23.475,6.95 -23.475,8.45 -17.5,8.45 -17.5,6.95
DRAIN on Top Layer "7" (solid, pour order 26): 2.06,-23.173 2.06,-23.86 2.825,-24.625 5.65,-24.625 5.65,-16.052 2.781,-16.052 2.06,-16.774 2.06,-19.5 1.409,-20.151 -1.151,-20.151 -1.5,-20.5 -1.5,-22.773 -1.1,-23.173
GND on Top Layer "3" (solid, pour order 27): 2.8,19.1 0.6,19.1 0.3,18.8 0.3,17.3 0.6,17 2.8,17
GND on Bottom Layer "15" (solid, pour order 37): -27,-27 -27,27 27,27 27,-27

## Silkscreen, mask and mechanical layers (free items; w line width, h text height)
Bottom Overlay:
  text "18-25V DC" at 4.399,18 h0.8
  text "6S Lipo" at 4.399,16.367 h0.8
  text "XT30" at 4.399,14.967 h0.8
  text "Basler Dart" at -16.535,-5.1 h0.8
  text "This Side" at 23.932,-5.1 h0.8
  text "GPIO" at -19.2,-6.4 h0.8
  text "Towards Camera" at 26.065,-6.4 h0.8
  text "3x2P 1.27mm" at -16.468,-7.8 h0.8
  text "(Outside)" at 23.732,-7.8 h0.8
  text "UQ BIOROBOT" at 4.199,-16.5 h0.8
  text "IR LED Control Board" at 7.664,-17.8 h0.8
  text "Rev 1.0" at 2.533,-19.2 h0.8
Top Solder:
  circle w0.65: c13.9,-13.075 r0.3
  circle w0.65: c18.325,-17.075 r0.3
  circle w0.65: c16.15,-15.05 r0.3
Mechanical 1:
  circle w0.2: c0,0 r14.25
  pour cut-out: 0,-14.25 cw(c0,0) -14.25,0 cw(c0,0) 0,14.25 cw(c0,0) 14.25,0 cw(c0,0)
  lines w0.2: -27,-21 ccw(c-21,-21) -21,-27 0,-27 21,-27 ccw(c21,-21) 27,-21 27,0 27,21 ccw(c21,21) 21,27 0,27 -21,27 ccw(c-21,21) -27,21 -27,0 -27,-21